# Altium PCB DC-UPS-v1.0.PcbDoc (part 2 of 8)
Units mil, origin at the board's own origin, x right, y up, seen from the top; angles counter-clockwise.
Board outline 5905.51 x 3937.01 mil, 4 copper layers (Top Layer, SIG+PWR, SIG+GND, Bottom Layer), stack 62.449 mil thick; 278 components, 138 nets, 716 pads, 780 vias.
Unrouted connection lines stored in the file: 13.
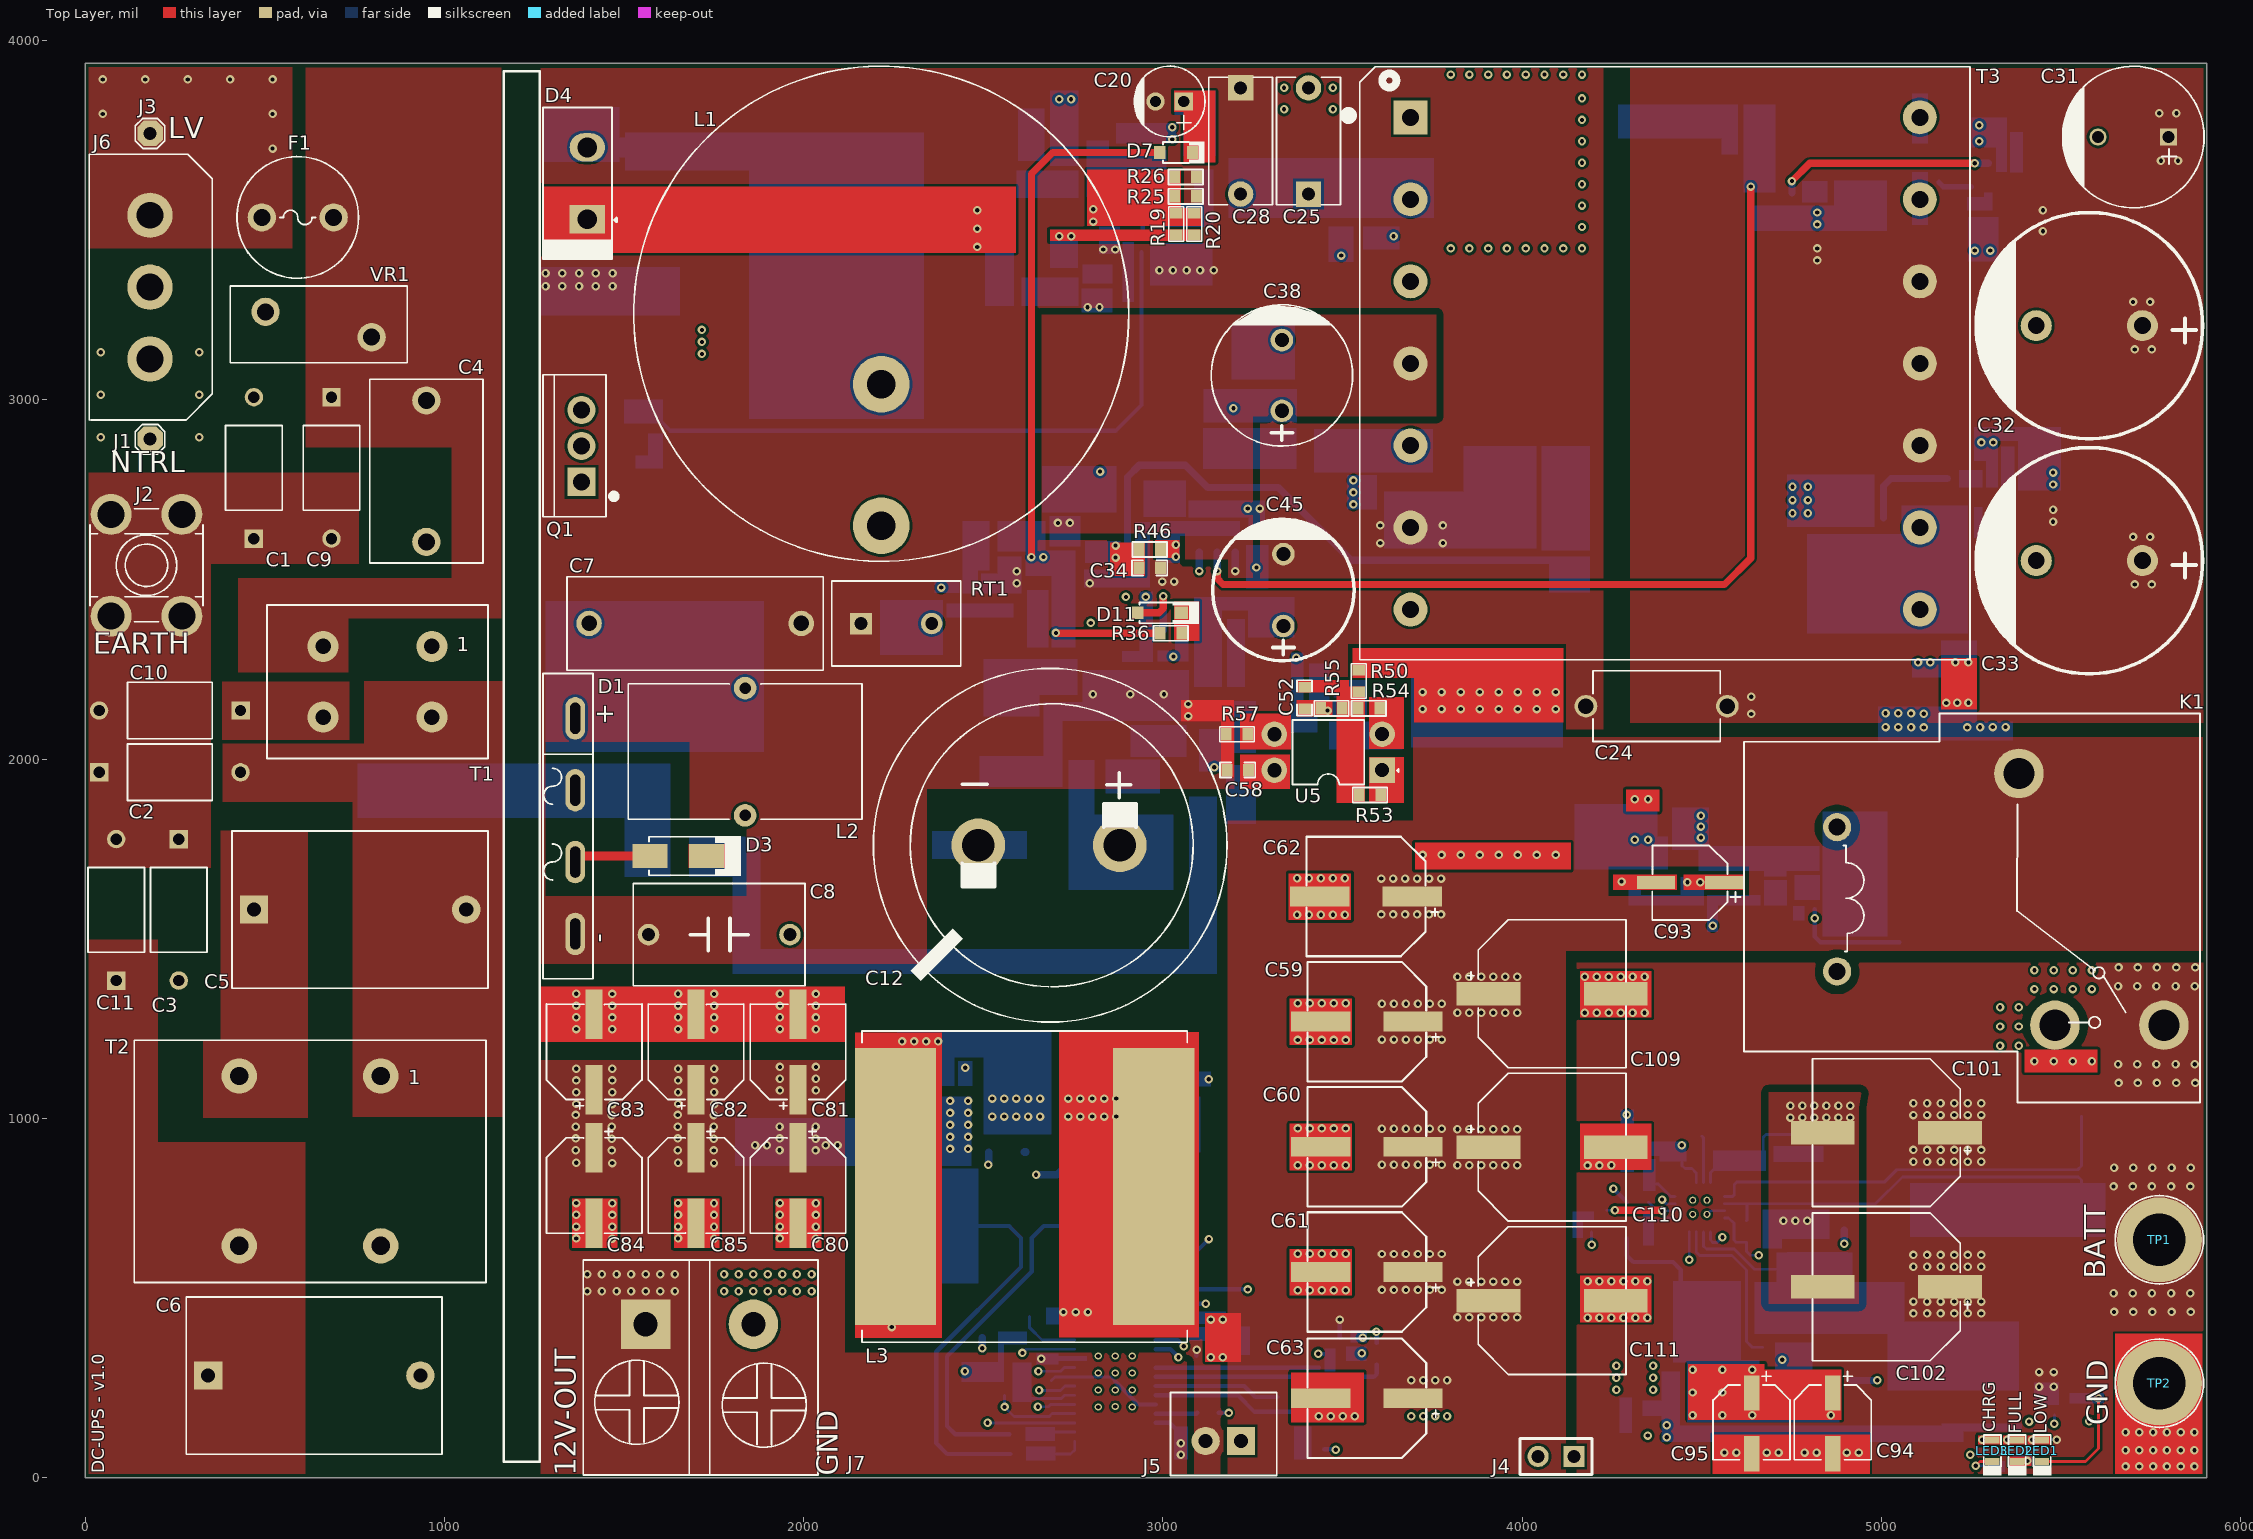
[diagram p0: Top Layer view]

## Part data (continued)
C18: library part CC0603KRX7R7BB224, "CAP CER 0.22UF 16V X7R 0603", Manufacturer=Yageo, Supplier Part Number=311-1426-1-ND, Voltage Rating (DC)=16V, ComponentLink1Description=https://datasheet.ciiva.com/11788/0900766b80d84f1d-11788400.pdf?src-supplier=Rs, ComponentLink1URL=https://datasheet.ciiva.com/11788/0900766b80d84f1d-11788400.pdf?src-supplier=Rs, ComponentLink2Description=https://datasheet.ciiva.com/176/mlccorderingcode-176606.pdf?src-supplier=Digikey, ComponentLink2URL=https://datasheet.ciiva.com/176/mlccorderingcode-176606.pdf?src-supplier=Digikey, ComponentLink3Description=https://datasheet.ciiva.com/176/mlccorderingcode-176607.pdf?src-supplier=Digikey, ComponentLink3URL=https://datasheet.ciiva.com/176/mlccorderingcode-176607.pdf?src-supplier=Digikey, ComponentLink4Description=https://datasheet.ciiva.com/176/mlccorderingcode-176608.pdf?src-supplier=Digikey, ComponentLink4URL=https://datasheet.ciiva.com/176/mlccorderingcode-176608.pdf?src-supplier=Digikey, Halogen Free=5694HalogenFree, Item Type=Capacitor, Lead Free=5697LeadFree, Manufacturer Part Number=CC0603KRX7R7BB224, Material=4241ConductorMaterial, Pricing="1=0.1, 10=0.058, 50=0.0334, 100=0.0258, 500=0.01944, 1000=0.01528 (USD)", RoHS=Yes, Stock=45192, Supplier=Digikey
C19 C74 C75 C76 C86 C89 C90 C98 C103 C105 C106: library part CL10B104KB8NNNL, "CAP CER 0.1UF 50V X7R 0603", Capacitance=100nF, Case/Package=0603, Dielectric=X7R, LCSC Part Number=C913912, Manufacturer=Samsung, Max Operating Temperature=125°C, Min Operating Temperature=-55°C, Package Quantity=15000, Supplier Part Number 1=1276-CL10B104KB8NNNLCT-ND, Tolerance=10%, Voltage Rating=50V, ComponentLink1Description=https://www.verical.com/server-webapp/html/getDatasheet?partID=357523&src-supplier=Verical, ComponentLink1URL=https://www.verical.com/server-webapp/html/getDatasheet?partID=357523&src-supplier=Verical, ComponentLink2Description=https://media.digikey.com/pdf/Data%20Sheets/Samsung%20PDFs/CL_Series_MLCC_ds.pdf?src-supplier=Digi-Key, ComponentLink2URL=https://media.digikey.com/pdf/Data%20Sheets/Samsung%20PDFs/CL_Series_MLCC_ds.pdf?src-supplier=Digi-Key, Construction=Flat, Depth=0.8mm, Height=0.8mm, Item Type=Capacitor, Length=1.6mm, Manufacturer Part Number=CL10B104KB8NNNL, Mount="Surface Mount", Packaging="Tape and Reel", Pricing 1="1=0.1, 10=0.03, 50=0.0164, 100=0.0134, 500=0.00958, 1000=0.00753, 2500=0.00684, 5000=0.0063 (USD)", Radiation Hardening=No, RoHS Compliant=Yes, Series=CL, Stock 1=3731229, Supplier 1=Digi-Key, Thickness=0.035inch, Voltage Rating (DC)=50V, Width=0.031inch
C20: library part ERM1HM100D11OT, "10uF 50V ±20% 90mA@100kHz Plugin,D5xL11mm Aluminum Electrolytic Capacitors - Leaded ROHS", LCSC Part Number=C106599, Manufacturer=AISHI, Item Type=Capacitor, Manufacturer Part Number=ERM1HM100D11OT, Pricing="1000=0.0178, 4000=0.017, 15000=0.0163, 40000=0.0158, 100000=0.015 (USD)", RoHS=No, Supplier="Future Electronics"
C21: library part CC1206KKX7R9BB474, "CAP CER 0.47UF 50V X7R 1206", LCSC Part Number=C277483, Manufacturer=Yageo, ComponentLink1Description=https://datasheet.ciiva.com/13210/upy-gp-np0-16v-to-50v-8-13210236.pdf?src-supplier=Mouser, ComponentLink1URL=https://datasheet.ciiva.com/13210/upy-gp-np0-16v-to-50v-8-13210236.pdf?src-supplier=Mouser, ComponentLink2Description=https://datasheet.ciiva.com/181/mlccorderingcode-181013.pdf?src-supplier=Digikey, ComponentLink2URL=https://datasheet.ciiva.com/181/mlccorderingcode-181013.pdf?src-supplier=Digikey, ComponentLink3Description=https://datasheet.ciiva.com/181/mlccorderingcode-181014.pdf?src-supplier=Digikey, ComponentLink3URL=https://datasheet.ciiva.com/181/mlccorderingcode-181014.pdf?src-supplier=Digikey, ComponentLink4Description=https://datasheet.ciiva.com/181/mlccorderingcode-181015.pdf?src-supplier=Digikey, ComponentLink4URL=https://datasheet.ciiva.com/181/mlccorderingcode-181015.pdf?src-supplier=Digikey, Item Type=Capacitor, Manufacturer Part Number=CC1206KKX7R9BB474, Material=4241ConductorMaterial, Pricing="3000=0.0393, 9000=0.0378, 15000=0.0371, 30000=0.0362, 60000=0.0349 (USD)", RoHS=Yes, Stock=36000, Supplier="Future Electronics"
C22: library part C0603C100K5RACAUTO, "CAP CER 10PF 50V X7R 0603", LCSC Part Number=C2170082, Manufacturer=KEMET, Temperature Coefficient=30ppm/°C, ComponentLink1Description=http://www.farnell.com/datasheets/2750555.pdf?src-supplier=Farnell, ComponentLink1URL=http://www.farnell.com/datasheets/2750555.pdf?src-supplier=Farnell, ComponentLink2Description=https://api.kemet.com/component-edge/download/datasheet/C0603C100K5RACAUTO.pdf?src-supplier=Digikey, ComponentLink2URL=https://api.kemet.com/component-edge/download/datasheet/C0603C100K5RACAUTO.pdf?src-supplier=Digikey, ComponentLink3Description=http://www.farnell.com/datasheets/2750555.pdf?src-supplier=Element14, ComponentLink3URL=http://www.farnell.com/datasheets/2750555.pdf?src-supplier=Element14, ComponentLink4Description=https://datasheet.octopart.com/C0603C100K5RACAUTO-KEMET-datasheet-86780146.pdf?src-supplier=Newark, ComponentLink4URL=https://datasheet.octopart.com/C0603C100K5RACAUTO-KEMET-datasheet-86780146.pdf?src-supplier=Newark, ComponentLink5Description=http://www.farnell.com/datasheets/2750555.pdf?src-supplier=Newark, ComponentLink5URL=http://www.farnell.com/datasheets/2750555.pdf?src-supplier=Newark, ComponentLink6Description=https://datasheet.octopart.com/C0603C100K5RACAUTO-KEMET-datasheet-140424581.pdf?src-supplier=TME, ComponentLink6URL=https://datasheet.octopart.com/C0603C100K5RACAUTO-KEMET-datasheet-140424581.pdf?src-supplier=TME, Height=870um, Item Type=Capacitor, Manufacturer Part Number=C0603C100K5RACAUTO, Material=4241ConductorMaterial, Pricing="1=0.25, 10=0.116, 50=0.116, 100=0.07, 1000=0.061, 10000=0.047 (USD)", RoHS=Yes, Stock=11331, Supplier=Mouser
C23: library part 06031C102KAT2A, "CAP CER 1000PF 100V X7R 0603", LCSC Part Number=C2167292, Manufacturer="Kyocera AVX", ComponentLink1Description=https://datasheet.ciiva.com/5422/cx7r-218113-5422905.pdf?src-supplier=Mouser, ComponentLink1URL=https://datasheet.ciiva.com/5422/cx7r-218113-5422905.pdf?src-supplier=Mouser, ComponentLink2Description=https://datasheet.ciiva.com/11499/cx7r-11499669.pdf?src-supplier=Avnet, ComponentLink2URL=https://datasheet.ciiva.com/11499/cx7r-11499669.pdf?src-supplier=Avnet, ComponentLink3Description=https://datasheet.ciiva.com/2987/cx7r-2987733.pdf?src-supplier=Avnet, ComponentLink3URL=https://datasheet.ciiva.com/2987/cx7r-2987733.pdf?src-supplier=Avnet, ComponentLink4Description=https://datasheet.ciiva.com/150/cx7r-150395.pdf?src-supplier=Digikey, ComponentLink4URL=https://datasheet.ciiva.com/150/cx7r-150395.pdf?src-supplier=Digikey, ComponentLink5Description=https://datasheet.ciiva.com/150/cx7r-150396.pdf?src-supplier=Digikey, ComponentLink5URL=https://datasheet.ciiva.com/150/cx7r-150396.pdf?src-supplier=Digikey, ComponentLink6Description=https://datasheet.ciiva.com/150/cx7r-150397.pdf?src-supplier=Digikey, ComponentLink6URL=https://datasheet.ciiva.com/150/cx7r-150397.pdf?src-supplier=Digikey, ComponentLink7Description=https://datasheet.ciiva.com/1124/1679506-1124198.pdf?src-supplier=Element14, ComponentLink7URL=https://datasheet.ciiva.com/1124/1679506-1124198.pdf?src-supplier=Element14, ComponentLink8Description=https://datasheet.ciiva.com/22693/1679506-22693579.pdf?src-supplier=Element14, ComponentLink8URL=https://datasheet.ciiva.com/22693/1679506-22693579.pdf?src-supplier=Element14, ComponentLink9Description=https://datasheet.ciiva.com/7855/1679506-7855033.pdf?src-supplier=Element14, ComponentLink9URL=https://datasheet.ciiva.com/7855/1679506-7855033.pdf?src-supplier=Element14, ComponentLink10Description=https://datasheet.ciiva.com/7855/84526-7855189.pdf?src-supplier=Element14, ComponentLink10URL=https://datasheet.ciiva.com/7855/84526-7855189.pdf?src-supplier=Element14, ComponentLink11Description=https://datasheet.ciiva.com/16289/cx7r-16289400.pdf?src-supplier=Future+Electronics, ComponentLink11URL=https://datasheet.ciiva.com/16289/cx7r-16289400.pdf?src-supplier=Future+Electronics, ComponentLink12Description=https://datasheet.ciiva.com/14594/70001075-14594623.pdf?src-supplier=Allied+Electronics, ComponentLink12URL=https://datasheet.ciiva.com/14594/70001075-14594623.pdf?src-supplier=Allied+Electronics, ComponentLink13Description=https://datasheet.ciiva.com/14600/70001075-14600988.pdf?src-supplier=Allied+Electronics, ComponentLink13URL=https://datasheet.ciiva.com/14600/70001075-14600988.pdf?src-supplier=Allied+Electronics, Item Type=Capacitor, Lead Free=5697LeadFree, Manufacturer Part Number=06031C102KAT2A, Pricing="4000=0.0086, 8000=0.0084, 16000=0.0082, 24000=0.008, 32000=0.0079 (USD)", RoHS=Yes, Stock=656000, Supplier=Avnet
C24: library part DE1E3RA222MA4BN01F, "2200 pF ±20% 250VAC Ceramic Capacitor E Radial, Disc", LCSC Part Number=C343981, Manufacturer=Murata, ComponentLink1Description=http://www.farnell.com/datasheets/2608335.pdf?src-supplier=Farnell, ComponentLink1URL=http://www.farnell.com/datasheets/2608335.pdf?src-supplier=Farnell, ComponentLink2Description=http://www.farnell.com/datasheets/2608335.pdf?src-supplier=Newark, ComponentLink2URL=http://www.farnell.com/datasheets/2608335.pdf?src-supplier=Newark, ComponentLink3Description=https://datasheet.octopart.com/DE1E3RA222MA4BN01F-Murata-datasheet-166166226.pdf?src-supplier=TME, ComponentLink3URL=https://datasheet.octopart.com/DE1E3RA222MA4BN01F-Murata-datasheet-166166226.pdf?src-supplier=TME, Item Type=Capacitors, Manufacturer Part Number=DE1E3RA222MA4BN01F, Pricing="1=0.42, 10=0.271, 50=0.271, 100=0.146, 1000=0.114, 10000=0.097 (USD)", RoHS=Yes, Stock=37677, Supplier=Mouser
C25 C28: library part KP223J2J0701, "22nF -40℃~+100℃ ±5% 630V Plugin,P=7.5mm Polypropylene Film Capacitors (CBB) ROHS", LCSC Part Number=C390073, Manufacturer=KYET, Package=Plugin,P=7.5mm, ComponentLink1Description=LCSC, ComponentLink1URL=https://www.lcsc.com/product-detail/Polypropylene-Film-Capacitors-CBB_KYET-KP223J2J0701_C390073.html, Item Type=Capacitor, Manufacturer Part Number=KP223J2J0701
C26 C27 C35 C36 C92: library part UMK316AB7475KL-T, "CAP CER 4.7UF 50V X7R 1206", Case Code (Imperial)=1206, Case Code (Metric)=3216, Dielectric=X7R, LCSC Part Number=C92853, Manufacturer="Taiyo Yuden", Max Operating Temperature=125°C, Min Operating Temperature=-55°C, Package Quantity=2000, Tolerance=10%, Voltage Rating=50V, Case/Package=1206, ComponentLink1Description=https://datasheet.ciiva.com/170/umk316ab7475kl-t-ss-170928.pdf?src-supplier=Digikey, ComponentLink1URL=https://datasheet.ciiva.com/170/umk316ab7475kl-t-ss-170928.pdf?src-supplier=Digikey, ComponentLink2Description=https://datasheet.ciiva.com/2990/umk316ab7475kl-t-ss-2990070.pdf?src-supplier=Avnet, ComponentLink2URL=https://datasheet.ciiva.com/2990/umk316ab7475kl-t-ss-2990070.pdf?src-supplier=Avnet, ComponentLink3Description=https://datasheet.ciiva.com/15922/1010umk316ab7475kl-t-15922628.pdf?src-supplier=Onlinecomponents.com, ComponentLink3URL=https://datasheet.ciiva.com/15922/1010umk316ab7475kl-t-15922628.pdf?src-supplier=Onlinecomponents.com, ComponentLink4Description=https://datasheet.ciiva.com/7975/1481447-7975911.pdf?src-supplier=Element14, ComponentLink4URL=https://datasheet.ciiva.com/7975/1481447-7975911.pdf?src-supplier=Element14, ComponentLink5Description=https://datasheet.ciiva.com/5413/mlcc-all-e-541559-5413006.pdf?src-supplier=Mouser, ComponentLink5URL=https://datasheet.ciiva.com/5413/mlcc-all-e-541559-5413006.pdf?src-supplier=Mouser, Construction=Flat, Depth=1.6mm, Height=1.6mm, Item Type=Capacitor, Length=3.2mm, Manufacturer Part Number=UMK316AB7475KL-T, Mounting Technology="Surface Mount", Packaging="Tape and Reel", Pins=2, Pricing="1=0.3, 10=0.198, 50=0.146, 100=0.1189, 500=0.09386, 1000=0.07925 (USD)", Radiation Hardening=No, Reach SVHC Compliant=Unknown, RoHS=Yes, RoHS Compliant=Yes, Series=M, Stock=392550, Supplier=Digikey, Termination=SMD/SMT, Voltage Rating (DC)=50V, Width=1.6mm
C29: library part GRM31A5C2J151JW01D, "CAP CER 150PF 630V C0G/NP0 1206", LCSC Part Number=C162445, Manufacturer=Murata, ComponentLink1Description=https://datasheet.ciiva.com/138/partnumbering-e-01-138796.pdf?src-supplier=Digikey, ComponentLink1URL=https://datasheet.ciiva.com/138/partnumbering-e-01-138796.pdf?src-supplier=Digikey, ComponentLink2Description=https://datasheet.ciiva.com/138/partnumbering-e-01-138797.pdf?src-supplier=Digikey, ComponentLink2URL=https://datasheet.ciiva.com/138/partnumbering-e-01-138797.pdf?src-supplier=Digikey, ComponentLink3Description=https://datasheet.ciiva.com/138/partnumbering-e-01-138798.pdf?src-supplier=Digikey, ComponentLink3URL=https://datasheet.ciiva.com/138/partnumbering-e-01-138798.pdf?src-supplier=Digikey, ComponentLink4Description=https://datasheet.ciiva.com/13240/c02e-2905-13240518.pdf?src-supplier=Mouser, ComponentLink4URL=https://datasheet.ciiva.com/13240/c02e-2905-13240518.pdf?src-supplier=Mouser, Item Type=Capacitor, Manufacturer Part Number=GRM31A5C2J151JW01D, Pricing="1=0.35, 10=0.194, 50=0.194, 100=0.12, 1000=0.1, 10000=0.08 (USD)", RoHS=Yes, Stock=4361, Supplier=Mouser
C30: library part GRM31A5C3A101JW01D, "CAP CER 100PF 1KV 5% NP0 1206", LCSC Part Number=C162451, Manufacturer=Murata, ComponentLink1Description=https://datasheet.ciiva.com/29535/partnumbering-e-01-29535608.pdf?src-supplier=Digikey, ComponentLink1URL=https://datasheet.ciiva.com/29535/partnumbering-e-01-29535608.pdf?src-supplier=Digikey, ComponentLink2Description=https://datasheet.ciiva.com/7829/1666664-7829029.pdf?src-supplier=Element14, ComponentLink2URL=https://datasheet.ciiva.com/7829/1666664-7829029.pdf?src-supplier=Element14, Item Type=Capacitor, Manufacturer Part Number=GRM31A5C3A101JW01D, Pricing="4000=0.0742, 8000=0.0723, 12000=0.0712, 16000=0.0704, 20000=0.068 (USD)", RoHS=Yes, Stock=4000, Supplier="Future Electronics"
C31: library part EEU-FR1V681B, "CAP ALUM 680UF 20% 35V RADIAL TH", Case/Package=Radial, ESR (Equivalent Series Resistance)=20mR, LCSC Part Number=C178718, Manufacturer=Panasonic, Max Operating Temperature=105°C, Min Operating Temperature=-40°C, Package Quantity=500, Ripple Current=2.18A, Tolerance=20%, Voltage Rating=35V, ComponentLink1Description=https://datasheet.ciiva.com/11677/aba0000ce132-11677705.pdf?src-supplier=Avnet, ComponentLink1URL=https://datasheet.ciiva.com/11677/aba0000ce132-11677705.pdf?src-supplier=Avnet, ComponentLink2Description=https://datasheet.ciiva.com/15941/aba0000ce132-15941222.pdf?src-supplier=Onlinecomponents.com, ComponentLink2URL=https://datasheet.ciiva.com/15941/aba0000ce132-15941222.pdf?src-supplier=Onlinecomponents.com, ComponentLink3Description=https://datasheet.ciiva.com/43469/1653413-43469593.pdf?src-supplier=Farnell, ComponentLink3URL=https://datasheet.ciiva.com/43469/1653413-43469593.pdf?src-supplier=Farnell, ComponentLink4Description=https://datasheet.ciiva.com/46371/1653413-46371786.pdf?src-supplier=Element14, ComponentLink4URL=https://datasheet.ciiva.com/46371/1653413-46371786.pdf?src-supplier=Element14, ComponentLink5Description=https://datasheet.ciiva.com/29248/448590-da-01-en-alu-kondensator-fr-r-680-uf-35v-500st-29248054.pdf?src-supplier=Conrad, ComponentLink5URL=https://datasheet.ciiva.com/29248/448590-da-01-en-alu-kondensator-fr-r-680-uf-35v-500st-29248054.pdf?src-supplier=Conrad, Diameter=10mm, Features="General Purpose", Height=20mm, Height - Seated (Max)=0.866inch, Impedance=20mR, Item Type=Capacitor, Lead Diameter=0.6mm, Lead Pitch=5mm, Lead/Base Style=Straight, Length=20mm, Life (Hours)=10000Hour, Manufacturer Part Number=EEU-FR1V681B, Mounting Technology="Through Hole", Packaging="Tape and Reel", Pricing="1=0.93, 10=0.674, 50=0.5894, 100=0.4803 (USD)", Radiation Hardening=No, Reach SVHC Compliant=Yes, RoHS=Yes, RoHS Compliant=Yes, Series=FR, Stock=566, Supplier=Digikey, Termination=Radial, Voltage Rating (DC)=35V
C32 C33: library part ERF1VM222L25OT, "2200uF 35V ±20% Plugin,D16xL25mm Aluminum Electrolytic Capacitors - Leaded ROHS", LCSC Part Number=C106547, Manufacturer=AISHI, Item Type=Capacitor, Manufacturer Part Number=ERF1VM222L25OT, Pricing="1=0.945, 10=0.446, 25=0.403, 50=0.338, 100=0.327, 250=0.316 (GBP)", RoHS=No, Stock=115, Supplier=Farnell
C34 C57: library part CGA3E2X8R1H473M080AA, "CAP CER 0.047UF 50V X8R 0603", Case Code (Imperial)=0603, Case Code (Metric)=1608, Dielectric=X8R, LCSC Part Number=C2172709, Manufacturer=TDK, Max Operating Temperature=150°C, Min Operating Temperature=-55°C, Package Quantity=4000, Ratings=AEC-Q200, Supplier Part Number 1=445-12603-1-ND, Tolerance=20%, Voltage Rating=50V, Capacitance=47nF, Case/Package=0603, Category="Ceramic Capacitors", ComponentLink1Description=http://www.mouser.com/ds/2/400/mlcc_automotive_hightemp_en-520039.pdf?src-supplier=Mouser, ComponentLink1URL=http://www.mouser.com/ds/2/400/mlcc_automotive_hightemp_en-520039.pdf?src-supplier=Mouser, ComponentLink2Description=https://product.tdk.com/info/en/catalog/spec/mlccspec_automotive_hightemp_en.pdf?src-supplier=Digi-Key, ComponentLink2URL=https://product.tdk.com/info/en/catalog/spec/mlccspec_automotive_hightemp_en.pdf?src-supplier=Digi-Key, ComponentLink3Description=http://product.tdk.com/en/catalog/datasheets/mlcc_automotive_hightemp_en.pdf?src-supplier=Avnet, ComponentLink3URL=http://product.tdk.com/en/catalog/datasheets/mlcc_automotive_hightemp_en.pdf?src-supplier=Avnet, Features="High Temperature", Height=0.8mm, Item Type=Capacitor, Length=0.063inch, Manufacturer Part Number=CGA3E2X8R1H473M080AA, Mount="Surface Mount", Packaging="Tape and Reel", Pricing 1="1=0.16000, 10=0.11200, 50=0.06360, 100=0.05260, 500=0.03690, 1000=0.03055 (USD)", RoHS=Yes, Stock 1=1279, Supplier 1=Digi-Key, Thickness=0.035inch, Voltage Rating (DC)=50V, Weight=7.1E-05oz, Width=0.031inch
C37 C41 C43: library part CC1206KRX7R9BB104, "CAP CER 0.1UF 50V X7R 1206", Case Code (Imperial)=1206, Case Code (Metric)=3216, Dielectric=X7R, Insulation Resistance=100GR, LCSC Part Number=311-1179-1-ND, Manufacturer=Yageo, Max Operating Temperature=125°C, Min Operating Temperature=-55°C, Tolerance=10%, Voltage=50V, Case/Package=1206, ComponentLink1Description=https://datasheet.ciiva.com/11786/0900766b80d84f1d-11786968.pdf?src-supplier=Rs, ComponentLink1URL=https://datasheet.ciiva.com/11786/0900766b80d84f1d-11786968.pdf?src-supplier=Rs, ComponentLink2Description=https://datasheet.ciiva.com/7978/1489800-7978230.pdf?src-supplier=Element14, ComponentLink2URL=https://datasheet.ciiva.com/7978/1489800-7978230.pdf?src-supplier=Element14, ComponentLink3Description=https://datasheet.ciiva.com/28450/1489800-28450892.pdf?src-supplier=Element14, ComponentLink3URL=https://datasheet.ciiva.com/28450/1489800-28450892.pdf?src-supplier=Element14, ComponentLink4Description=https://datasheet.ciiva.com/144/mlccorderingcode-144906.pdf?src-supplier=Digikey, ComponentLink4URL=https://datasheet.ciiva.com/144/mlccorderingcode-144906.pdf?src-supplier=Digikey, ComponentLink5Description=https://datasheet.ciiva.com/144/mlccorderingcode-144905.pdf?src-supplier=Digikey, ComponentLink5URL=https://datasheet.ciiva.com/144/mlccorderingcode-144905.pdf?src-supplier=Digikey, ComponentLink6Description=https://datasheet.ciiva.com/144/mlccorderingcode-144907.pdf?src-supplier=Digikey, ComponentLink6URL=https://datasheet.ciiva.com/144/mlccorderingcode-144907.pdf?src-supplier=Digikey, ComponentLink7Description=https://datasheet.ciiva.com/5425/upy-gp-np0-16v-to-50v-8-3714-5425561.pdf?src-supplier=Mouser, ComponentLink7URL=https://datasheet.ciiva.com/5425/upy-gp-np0-16v-to-50v-8-3714-5425561.pdf?src-supplier=Mouser, ComponentLink8Description=https://datasheet.ciiva.com/28363/1734573-28363672.pdf?src-supplier=Element14, ComponentLink8URL=https://datasheet.ciiva.com/28363/1734573-28363672.pdf?src-supplier=Element14, ComponentLink9Description=https://datasheet.ciiva.com/46385/1734573-46385063.pdf?src-supplier=Element14, ComponentLink9URL=https://datasheet.ciiva.com/46385/1734573-46385063.pdf?src-supplier=Element14, ComponentLink10Description=https://datasheet.ciiva.com/15189/getdatasheetpartid-251811-15189275.pdf?src-supplier=Verical, ComponentLink10URL=https://datasheet.ciiva.com/15189/getdatasheetpartid-251811-15189275.pdf?src-supplier=Verical, Depth=1.6mm, Halogen Free=5694HalogenFree, Height=0.85mm, Item Type=Capacitor, Lead Free=5697LeadFree, Length=3.2mm, Manufacturer Part Number=CC1206KRX7R9BB104, Material=Ceramic, Mounting Technology="Surface Mount", Packaging="Tape and Reel", Pins=2, Pricing="1=0.19, 10=0.128, 50=0.0764, 100=0.0601, 500=0.04436, 1000=0.03672 (USD)", Radiation Hardening=No, Reach SVHC Compliant=Unknown, RoHS=Yes, RoHS Compliant=Yes, Series=CC, Stock=520624, Supplier=Digikey, Termination=SMD/SMT, Voltage Rating=50V, Voltage Rating (DC)=50V
C38: library part EEU-FR1V471B, "CAP ALUM 470UF 20% 35V RADIAL", LCSC Part Number=C713403, Leakage Current=164.5uA, Manufacturer=Panasonic, ComponentLink1Description=https://datasheet.ciiva.com/43469/1653413-43469590.pdf?src-supplier=Farnell, ComponentLink1URL=https://datasheet.ciiva.com/43469/1653413-43469590.pdf?src-supplier=Farnell, ComponentLink2Description=https://datasheet.ciiva.com/11678/aba0000ce132-11678063.pdf?src-supplier=Avnet, ComponentLink2URL=https://datasheet.ciiva.com/11678/aba0000ce132-11678063.pdf?src-supplier=Avnet, ComponentLink3Description=https://datasheet.ciiva.com/46371/1653413-46371772.pdf?src-supplier=Element14, ComponentLink3URL=https://datasheet.ciiva.com/46371/1653413-46371772.pdf?src-supplier=Element14, ComponentLink4Description=https://datasheet.ciiva.com/7805/1725490-7805503.pdf?src-supplier=Element14, ComponentLink4URL=https://datasheet.ciiva.com/7805/1725490-7805503.pdf?src-supplier=Element14, ComponentLink5Description=https://datasheet.ciiva.com/30252/9aba0000ce132-30252342.pdf?src-supplier=Onlinecomponents.com, ComponentLink5URL=https://datasheet.ciiva.com/30252/9aba0000ce132-30252342.pdf?src-supplier=Onlinecomponents.com, ComponentLink6Description=https://datasheet.ciiva.com/16387/aba0000ce132-16387061.pdf?src-supplier=Future+Electronics, ComponentLink6URL=https://datasheet.ciiva.com/16387/aba0000ce132-16387061.pdf?src-supplier=Future+Electronics, ComponentLink7Description=https://datasheet.ciiva.com/14602/70257620-14602201.pdf?src-supplier=Allied+Electronics, ComponentLink7URL=https://datasheet.ciiva.com/14602/70257620-14602201.pdf?src-supplier=Allied+Electronics, ComponentLink8Description=https://datasheet.ciiva.com/29247/448536-da-01-en-alu-kondensator-fr-r-470-uf-35v-500st-29247995.pdf?src-supplier=Conrad, ComponentLink8URL=https://datasheet.ciiva.com/29247/448536-da-01-en-alu-kondensator-fr-r-470-uf-35v-500st-29247995.pdf?src-supplier=Conrad, Item Type=Capacitor, Lead Free=5697LeadFree, Manufacturer Part Number=EEU-FR1V471B, Pins=2NUMBER, Pricing="1=0.78, 10=0.461, 50=0.461, 100=0.375, 1000=0.263, 10000=0.23 (USD)", RoHS=Yes, Stock=21799, Supplier=Mouser
C39: library part CC1206KKX5R9BB225, "CAP CER 2.2UF 50V X5R 1206", Case Code (Imperial)=1206, Case Code (Metric)=3216, Dielectric=X5R, LCSC Part Number=C577210, Manufacturer=Yageo, Max Operating Temperature=85°C, Min Operating Temperature=-55°C, Package Quantity=2000, Tolerance=10%, Voltage Rating=50V, Case/Package=1206, ComponentLink1Description=http://www.mouser.com/ds/2/447/Yageo_UPY-GP_NP0_16V-to-50V_9-358835.pdf?src-supplier=Mouser, ComponentLink1URL=http://www.mouser.com/ds/2/447/Yageo_UPY-GP_NP0_16V-to-50V_9-358835.pdf?src-supplier=Mouser, ComponentLink2Description=http://www.yageo.com/documents/recent/UPY-GPHC_X5R_4V-to-50V_25.pdf?src-supplier=Digikey, ComponentLink2URL=http://www.yageo.com/documents/recent/UPY-GPHC_X5R_4V-to-50V_25.pdf?src-supplier=Digikey, Halogen Free="Halogen Free", Height=1.45mm, Item Type=Capacitor, Lead Free="Lead Free", Length=0.126inch, Manufacturer Part Number=CC1206KKX5R9BB225, Material=4241ConductorMaterial, Mounting Technology="Surface Mount", Packaging="Tape and Reel", Pricing="1=0.59, 10=0.395, 50=0.3144, 100=0.2597, 500=0.20286, 1000=0.17244 (USD)", RoHS=Yes, RoHS Compliant=Yes, Series=CC, Stock=4588, Supplier=Digikey, Termination=SMD/SMT, Thickness=0.071inch, Voltage Rating (DC)=50V, Weight=0.000571oz, Width=0.063inch
C40 C42 C46 C96: library part GRM188R6YA225KA12D, "CAP, 2.2µF, 35V, 10%, X5R, 0603", Case Code (Imperial)=0603, Case Code (Metric)=1608, Dielectric=X5R, LCSC Part Number=C86017, Manufacturer=Murata, Max Operating Temperature=85°C, Min Operating Temperature=-55°C, Package Quantity=4000, Supplier Part Number 1=490-7204-1-ND, Tolerance=10%, Voltage=35V, Capacitance=2.2uF, Case/Package=0603, Category="Ceramic Capacitors", ComponentLink1Description=https://datasheet.ciiva.com/14906/partnumbering-e-01-14906490.pdf?src-supplier=Digi-Key, ComponentLink1URL=https://datasheet.ciiva.com/14906/partnumbering-e-01-14906490.pdf?src-supplier=Digi-Key, ComponentLink2Description=https://datasheet.ciiva.com/14906/partnumbering-e-01-14906491.pdf?src-supplier=Digi-Key, ComponentLink2URL=https://datasheet.ciiva.com/14906/partnumbering-e-01-14906491.pdf?src-supplier=Digi-Key, ComponentLink3Description=https://datasheet.ciiva.com/14906/partnumbering-e-01-14906492.pdf?src-supplier=Digi-Key, ComponentLink3URL=https://datasheet.ciiva.com/14906/partnumbering-e-01-14906492.pdf?src-supplier=Digi-Key, Depth=0.8mm, Height=0.8mm, Item Type=Capacitor, Lead Free="Lead Free", Length=1.6mm, Manufacturer Part Number=GRM188R6YA225KA12D, Material=Ceramic, Mount="Surface Mount", Packaging="Tape and Reel", Pricing 1="1=0.21000, 10=0.14100, 50=0.08480, 100=0.07170, 500=0.04904, 1000=0.04338 (USD)", REACH SVHC="No SVHC", RoHS=Yes, RoHS Compliant=Yes, Series=GRM, Stock 1=81665, Supplier 1=Digi-Key, Termination=SMD/SMT, Thickness=0.035inch, Voltage Rating=35V, Voltage Rating (DC)=35V, Weight=0.000222oz, Width=0.8mm
C44: library part CC1206KKX7R7BB225, "CAP CER 2.2UF 16V X7R 1206", LCSC Part Number=C107183, Manufacturer=Yageo, ComponentLink1Description=https://datasheet.ciiva.com/11788/0900766b80d84f1d-11788402.pdf?src-supplier=Rs, ComponentLink1URL=https://datasheet.ciiva.com/11788/0900766b80d84f1d-11788402.pdf?src-supplier=Rs, ComponentLink2Description=https://datasheet.ciiva.com/11466/upy-gphc-x7r-6-3v-to-50v-8-11466572.pdf?src-supplier=Avnet, ComponentLink2URL=https://datasheet.ciiva.com/11466/upy-gphc-x7r-6-3v-to-50v-8-11466572.pdf?src-supplier=Avnet, ComponentLink3Description=https://datasheet.ciiva.com/5425/upy-gphc-x7r-6-3v-to-50v-8-12304-5425499.pdf?src-supplier=Mouser, ComponentLink3URL=https://datasheet.ciiva.com/5425/upy-gphc-x7r-6-3v-to-50v-8-12304-5425499.pdf?src-supplier=Mouser, Item Type=Capacitors, Manufacturer Part Number=CC1206KKX7R7BB225, Material=4241ConductorMaterial, Pricing="1=0.22, 10=0.144, 50=0.1012, 100=0.0817, 500=0.06072, 1000=0.05312 (USD)", RoHS=Yes, Stock=202610, Supplier=Digikey
C45: library part ERR1VM102G20OT, "1000uF 35V ±20% Plugin,D10xL20mm Aluminum Electrolytic Capacitors - Leaded ROHS", LCSC Part Number=C398835, Manufacturer=AISHI, Package=Plugin,D10xL20mm, ComponentLink1Description=LCSC, ComponentLink1URL=https://www.lcsc.com/product-detail/Aluminum-Electrolytic-Capacitors-Leaded_AISHI-Aihua-Group-ERR1VM102G20OT_C398835.html, Item Type=Capacitor, Manufacturer Part Number=ERR1VM102G20OT
C47: library part GRM31CR72A105KA01K, "CAP CER 1UF 100V X7R 1206", Case Code (Imperial)=1206, Case Code (Metric)=3216, Dielectric=X7R, LCSC Part Number=C909823, Manufacturer=Murata, Max Operating Temperature=125°C, Min Operating Temperature=-55°C, Package Quantity=1, Supplier Part Number 1=490-6523-1-ND, Tolerance=10%, Voltage Rating=100V, Capacitance=1uF, Case/Package=1206, Category="Ceramic Capacitors", ComponentLink1Description=https://datasheet.ciiva.com/11616/product-11616604.pdf?src-supplier=Avnet, ComponentLink1URL=https://datasheet.ciiva.com/11616/product-11616604.pdf?src-supplier=Avnet, ComponentLink2Description=https://datasheet.ciiva.com/6264/partnumbering-e-01-6264397.pdf?src-supplier=Digi-Key, ComponentLink2URL=https://datasheet.ciiva.com/6264/partnumbering-e-01-6264397.pdf?src-supplier=Digi-Key, ComponentLink3Description=https://datasheet.ciiva.com/6264/partnumbering-e-01-6264398.pdf?src-supplier=Digi-Key, ComponentLink3URL=https://datasheet.ciiva.com/6264/partnumbering-e-01-6264398.pdf?src-supplier=Digi-Key, ComponentLink4Description=https://datasheet.ciiva.com/6264/partnumbering-e-01-6264399.pdf?src-supplier=Digi-Key, ComponentLink4URL=https://datasheet.ciiva.com/6264/partnumbering-e-01-6264399.pdf?src-supplier=Digi-Key, Construction=Flat, Depth=1.6mm, Height=1.6mm, Length=3.2mm, Manufacturer Part Number=GRM31CR72A105KA01K, Mount="Surface Mount", Packaging="Tape and Reel", Pricing 1="1=0.48000, 10=0.33000, 50=0.23100, 100=0.19800, 500=0.14850, 1000=0.12540, 2500=0.11880 (USD)", Radiation Hardening=No, RoHS=Yes, RoHS Compliant=Yes, Series=GRM, Stock 1=11842, Supplier 1=Digi-Key, Termination=SMD/SMT, Thickness=0.071inch, Voltage Rating (DC)=100V, Width=1.6mm
C48 C49 C50: library part CC0603KRX5R7BB475, "CAP CER 4.7UF 16V X5R 0603", Case Code (Imperial)=0603, Case Code (Metric)=1608, Dielectric=X5R, LCSC Part Number=C277476, Manufacturer=Yageo, Max Operating Temperature=85°C, Min Operating Temperature=-55°C, Resistor Type=Ceramic, Supplier Part Number 1=311-1785-1-ND, Tolerance=10%, Voltage Rating=16V, Capacitance=4.7uF, Case/Package=0603, Category="Ceramic Capacitors", ComponentLink1Description=http://www.mouser.com/ds/2/447/UPY-GPHC_X5R_4V-to-50V_25-1131599.pdf?src-supplier=Mouser, ComponentLink1URL=http://www.mouser.com/ds/2/447/UPY-GPHC_X5R_4V-to-50V_25-1131599.pdf?src-supplier=Mouser, ComponentLink2Description=http://www.yageo.com/documents/recent/UPY-GPHC_X5R_4V-to-50V_25.pdf?src-supplier=Digi-Key, ComponentLink2URL=http://www.yageo.com/documents/recent/UPY-GPHC_X5R_4V-to-50V_25.pdf?src-supplier=Digi-Key, Depth=0.8mm, Halogen Free="Halogen Free", Height=0.8mm, Item Type=Capacitor, Lead Free="Lead Free", Length=1.6mm, Manufacturer Part Number=CC0603KRX5R7BB475, Mount="Surface Mount", Packaging="Tape and Reel", Pricing 1="1=0.20000, 10=0.13800, 50=0.08280, 100=0.06990, 500=0.04784, 1000=0.04233 (USD)", RoHS=Yes, RoHS Compliant=Yes, Series=CC, Stock 1=547703, Supplier 1=Digi-Key, Termination=SMD/SMT, Thickness=0.037inch, Voltage Rating (DC)=16V, Weight=7.1E-05oz, Width=0.8mm
C51 C54: library part CC0603KRX7R0BB103, "CAP CER 10000PF 100V X7R 0603", Case Code (Imperial)=0603, Case Code (Metric)=1608, Dielectric=X7R, Dielectric Material=Ceramic, LCSC Part Number=C107059, Manufacturer=Yageo, Max Operating Temperature=125°C, Min Operating Temperature=-55°C, Package Quantity=4000, Tolerance=10%, Voltage Rating=100V, Case/Package=0603, ComponentLink1Description=https://datasheet.ciiva.com/8033/1669968-8033774.pdf?src-supplier=Element14, ComponentLink1URL=https://datasheet.ciiva.com/8033/1669968-8033774.pdf?src-supplier=Element14, ComponentLink2Description=https://datasheet.ciiva.com/13389/upy-gphc-x7r-6-3v-to-50v-8-13389353.pdf?src-supplier=Mouser, ComponentLink2URL=https://datasheet.ciiva.com/13389/upy-gphc-x7r-6-3v-to-50v-8-13389353.pdf?src-supplier=Mouser, ComponentLink3Description=https://datasheet.ciiva.com/17458/upy-np0x7r-mv-100-to-630v-9-17458073.pdf?src-supplier=Future+Electronics, ComponentLink3URL=https://datasheet.ciiva.com/17458/upy-np0x7r-mv-100-to-630v-9-17458073.pdf?src-supplier=Future+Electronics, ComponentLink4Description=https://datasheet.ciiva.com/26829/getdatasheetpartid-626135-26829418.pdf?src-supplier=Verical, ComponentLink4URL=https://datasheet.ciiva.com/26829/getdatasheetpartid-626135-26829418.pdf?src-supplier=Verical, Construction=Flat, Depth=0.8mm, Height=0.8mm, Item Type=Capacitor, Lead Free="Lead Free", Length=1.6mm, Manufacturer Part Number=CC0603KRX7R0BB103, Mounting Technology="Surface Mount", Packaging="Tape and Reel", Pricing="4000=0.0051, 16000=0.0048, 60000=0.0045, 160000=0.0043, 400000=0.0041 (USD)", Radiation Hardening=No, Reach SVHC Compliant=Unknown, RoHS=Yes, RoHS Compliant=Yes, Series=CC, Stock=788000, Supplier="Future Electronics", Termination=SMD/SMT, Thickness=0.035inch, Voltage Rating (DC)=100V, Width=0.031inch
C52: library part CC0603JRNPO9BN101, "CAP CER 100PF 50V C0G/NPO 0603", Case Code (Imperial)=0603, Case Code (Metric)=1608, Dielectric=C0G, Insulation Resistance=100GR, LCSC Part Number=C14665, Manufacturer=Yageo, Max Operating Temperature=125°C, Min Operating Temperature=-55°C, Package Quantity=1, Resistor Type=Ceramic, Temperature Coefficient=30ppm/°C, Tolerance=5%, Voltage=50V, Capacitance=100pF, Case/Package=0603, Category="Ceramic Capacitors", ComponentLink1Description=https://datasheet.ciiva.com/11786/0900766b8079c870-11786060.pdf?src-supplier=RSComponents, ComponentLink1URL=https://datasheet.ciiva.com/11786/0900766b8079c870-11786060.pdf?src-supplier=RSComponents, ComponentLink2Description=https://datasheet.ciiva.com/7978/1443161-7978127.pdf?src-supplier=Element14, ComponentLink2URL=https://datasheet.ciiva.com/7978/1443161-7978127.pdf?src-supplier=Element14, ComponentLink3Description=https://datasheet.ciiva.com/28450/1443161-28450457.pdf?src-supplier=Element14, ComponentLink3URL=https://datasheet.ciiva.com/28450/1443161-28450457.pdf?src-supplier=Element14, ComponentLink4Description=https://datasheet.ciiva.com/46430/1835847-46430151.pdf?src-supplier=Element14, ComponentLink4URL=https://datasheet.ciiva.com/46430/1835847-46430151.pdf?src-supplier=Element14, ComponentLink5Description=https://datasheet.ciiva.com/144/mlccorderingcode-144629.pdf?src-supplier=Digi-Key, ComponentLink5URL=https://datasheet.ciiva.com/144/mlccorderingcode-144629.pdf?src-supplier=Digi-Key, ComponentLink6Description=https://datasheet.ciiva.com/144/mlccorderingcode-144628.pdf?src-supplier=Digi-Key, ComponentLink6URL=https://datasheet.ciiva.com/144/mlccorderingcode-144628.pdf?src-supplier=Digi-Key, ComponentLink7Description=https://datasheet.ciiva.com/144/mlccorderingcode-144630.pdf?src-supplier=Digi-Key, ComponentLink7URL=https://datasheet.ciiva.com/144/mlccorderingcode-144630.pdf?src-supplier=Digi-Key, ComponentLink8Description=https://datasheet.ciiva.com/11464/upy-gp-np0-16v-to-50v-8-11464725.pdf?src-supplier=Avnet, ComponentLink8URL=https://datasheet.ciiva.com/11464/upy-gp-np0-16v-to-50v-8-11464725.pdf?src-supplier=Avnet, ComponentLink9Description=https://datasheet.ciiva.com/26829/getdatasheetpartid-403525-26829372.pdf?src-supplier=Verical, ComponentLink9URL=https://datasheet.ciiva.com/26829/getdatasheetpartid-403525-26829372.pdf?src-supplier=Verical, Depth=0.8mm, Height=0.8mm, Lead Free="Lead Free", Length=1.6mm, Manufacturer Part Number=CC0603JRNPO9BN101, Mount="Surface Mount", Number of Pins=2, Packaging="Tape and Reel", Pricing 1="1=0.06030, 10=0.04400, 25=0.02170, 100=0.01580, 250=0.01330, 500=0.01300, 1000=0.01150, 3000=0.01010, 6000=0.00680 (USD)", Radiation Hardening=No, REACH SVHC=Unknown, RoHS=Yes, RoHS Compliant=Yes, Series=CC, Stock 1=10744, Supplier 1="Arrow Electronics", Supplier Part Number 1=CC0603JRNPO9BN101, Termination=SMD/SMT, Thickness=0.035inch, Voltage Rating=50V, Voltage Rating (DC)=50V, Width=0.8mm
C53: library part CS1608X7R221K500NRB, "50V 220pF X7R ±10% 0603 Multilayer Ceramic Capacitors MLCC - SMD/SMT ROHS", LCSC Part Number=C5255295, Manufacturer="Samwha Capacitors", Package=0603, ComponentLink1Description=LCSC, ComponentLink1URL=https://www.lcsc.com/product-detail/Multilayer-Ceramic-Capacitors-MLCC-SMD-SMT_Samwha-Capacitor-CS1608X7R221K500NRB_C5255295.html, Item Type=Capacitor, Manufacturer Part Number=CS1608X7R221K500NRB
C55 C58 C88: library part CC0603FRNPO9BN470, "CAP CER 47PF 50V NPO 0603", LCSC Part Number=C519486, Manufacturer=Yageo, ComponentLink1Description=https://datasheet.ciiva.com/5425/upy-gp-np0-16v-to-50v-8-5425545.pdf?src-supplier=Mouser, ComponentLink1URL=https://datasheet.ciiva.com/5425/upy-gp-np0-16v-to-50v-8-5425545.pdf?src-supplier=Mouser, ComponentLink2Description=https://datasheet.ciiva.com/11586/upy-gp-np0-16v-to-50v-8-11586472.pdf?src-supplier=Avnet, ComponentLink2URL=https://datasheet.ciiva.com/11586/upy-gp-np0-16v-to-50v-8-11586472.pdf?src-supplier=Avnet, Item Type=Capacitor, Manufacturer Part Number=CC0603FRNPO9BN470, Pricing="1=0.19, 10=0.126, 50=0.0756, 100=0.0594, 500=0.0439, 1000=0.03634 (USD)", RoHS=Yes, Stock=37282, Supplier=Digikey
C56: library part CC0603KRX7R0BB472, "CAP CER 4700PF 100V X7R 0603", Dielectric Material=4241ConductorMaterial, LCSC Part Number=C115052, Manufacturer=Yageo, Voltage Rating (AC)=100V, ComponentLink1Description=https://datasheet.ciiva.com/8033/1669968-8033781.pdf?src-supplier=Element14, ComponentLink1URL=https://datasheet.ciiva.com/8033/1669968-8033781.pdf?src-supplier=Element14, Item Type=Capacitor, Lead Free=5697LeadFree, Manufacturer Part Number=CC0603KRX7R0BB472, Pricing="1=0.1, 10=0.05, 50=0.0288, 100=0.0223, 500=0.0168, 1000=0.01319 (USD)", RoHS=Yes, Stock=67499, Supplier=Digikey
C59 C60 C61 C62 C63: library part 50SVPF18M, "CAP ALUM POLY 18UF 20% 50V SMD", LCSC Part Number=C178374, Manufacturer=Panasonic, ComponentLink1Description=https://datasheet.ciiva.com/24033/svpf-os-262415-24033818.pdf?src-supplier=Mouser, ComponentLink1URL=https://datasheet.ciiva.com/24033/svpf-os-262415-24033818.pdf?src-supplier=Mouser, ComponentLink2Description=https://datasheet.ciiva.com/25761/1734360-25761272.pdf?src-supplier=Farnell, ComponentLink2URL=https://datasheet.ciiva.com/25761/1734360-25761272.pdf?src-supplier=Farnell, ComponentLink3Description=https://datasheet.ciiva.com/48542/svpf-eng-ds-48542431.pdf?src-supplier=Distrelec, ComponentLink3URL=https://datasheet.ciiva.com/48542/svpf-eng-ds-48542431.pdf?src-supplier=Distrelec, ComponentLink4Description=https://datasheet.ciiva.com/22746/1734360-22746277.pdf?src-supplier=Element14, ComponentLink4URL=https://datasheet.ciiva.com/22746/1734360-22746277.pdf?src-supplier=Element14, Item Type=Capacitors, Manufacturer Part Number=50SVPF18M, Pricing="1=1.44, 10=0.995, 50=0.995, 100=0.799, 1000=0.562, 10000=0.498 (USD)", RoHS=Yes, Stock=2258, Supplier=Mouser
C64 C65 C66 C67 C68 C69 C70 C71 C72 C73: library part GRM21BR61H475KE51L, "CAP CER 4.7UF 50V X5R 0805", Capacitance=4.7uF, Case Code (Imperial)=0805, Case Code (Metric)=2012, Dielectric=X5R, LCSC Part Number=C162420, Manufacturer=Murata, Max Operating Temperature=85°C, Min Operating Temperature=-55°C, Supplier Part Number 1=1138707P, Tolerance=10%, Voltage Rating=50V, Case/Package=0805, Category="Ceramic Capacitors", ComponentLink1Description=http://www.farnell.com/datasheets/2079186.pdf?src-supplier=Farnell, ComponentLink1URL=http://www.farnell.com/datasheets/2079186.pdf?src-supplier=Farnell, ComponentLink2Description=http://components.arrow.com/part/dataview/61084395S454511N2606?src-supplier=Arrow+Electronics, ComponentLink2URL=http://components.arrow.com/part/dataview/61084395S454511N2606?src-supplier=Arrow+Electronics, ComponentLink3Description=http://www.farnell.com/datasheets/2079186.pdf?src-supplier=Element14, ComponentLink3URL=http://www.farnell.com/datasheets/2079186.pdf?src-supplier=Element14, ComponentLink4Description=http://search.murata.co.jp/Ceramy/image/img/A01X/G101/ENG/GRM21BR61H475KE51-01.pdf?src-supplier=Digi-Key, ComponentLink4URL=http://search.murata.co.jp/Ceramy/image/img/A01X/G101/ENG/GRM21BR61H475KE51-01.pdf?src-supplier=Digi-Key, ComponentLink5Description=https://search.murata.co.jp/Ceramy/image/img/A01X/G101/ENG/GRM21BR61H475KE51-01.pdf?src-supplier=Digi-Key, ComponentLink5URL=https://search.murata.co.jp/Ceramy/image/img/A01X/G101/ENG/GRM21BR61H475KE51-01.pdf?src-supplier=Digi-Key, ComponentLink6Description=http://www.farnell.com/datasheets/2079186.pdf?src-supplier=Newark, ComponentLink6URL=http://www.farnell.com/datasheets/2079186.pdf?src-supplier=Newark, Depth=1.25mm, Height=1.25mm, Item Type=Capacitor, Lead Free="Lead Free", Length=2mm, Manufacturer Part Number=GRM21BR61H475KE51L, Material=Ceramic, Mount="Surface Mount", Packaging="Tape and Reel", Pricing 1="500=0.09400, 1000=0.08800, 2000=0.08300, 5000=0.07500 (GBP)", Reach SVHC Compliant=Yes, RoHS=Yes, RoHS Compliant=Yes, Series=GRM, Stock 1=37300, Supplier 1=Rs, Thickness=0.055inch, Voltage Rating (DC)=50V, Width=0.049inch
C77: library part ECP-U1C684MA5, "CAP FILM 0.68UF 20% 16VDC 1206", LCSC Part Number=C569898, Manufacturer=Panasonic, Voltage Rating (AC)=16V, ComponentLink1Description=https://datasheet.ciiva.com/15225/getdatasheetpartid-259011-15225611.pdf?src-supplier=Verical, ComponentLink1URL=https://datasheet.ciiva.com/15225/getdatasheetpartid-259011-15225611.pdf?src-supplier=Verical, ComponentLink2Description=https://datasheet.ciiva.com/5710/31740-5710144.pdf?src-supplier=Farnell, ComponentLink2URL=https://datasheet.ciiva.com/5710/31740-5710144.pdf?src-supplier=Farnell, ComponentLink3Description=https://datasheet.ciiva.com/11792/0900766b80f2ea72-11792215.pdf?src-supplier=Rs, ComponentLink3URL=https://datasheet.ciiva.com/11792/0900766b80f2ea72-11792215.pdf?src-supplier=Rs, ComponentLink4Description=https://datasheet.ciiva.com/30243/abd0000ce12-30243739.pdf?src-supplier=Onlinecomponents.com, ComponentLink4URL=https://datasheet.ciiva.com/30243/abd0000ce12-30243739.pdf?src-supplier=Onlinecomponents.com, ComponentLink5Description=https://datasheet.ciiva.com/16397/abd0000ce12-16397064.pdf?src-supplier=Future+Electronics, ComponentLink5URL=https://datasheet.ciiva.com/16397/abd0000ce12-16397064.pdf?src-supplier=Future+Electronics, ComponentLink6Description=https://datasheet.ciiva.com/46399/31740-46399767.pdf?src-supplier=Element14, ComponentLink6URL=https://datasheet.ciiva.com/46399/31740-46399767.pdf?src-supplier=Element14, ComponentLink7Description=https://datasheet.ciiva.com/46400/31740-46400041.pdf?src-supplier=Element14, ComponentLink7URL=https://datasheet.ciiva.com/46400/31740-46400041.pdf?src-supplier=Element14, ComponentLink8Description=https://datasheet.ciiva.com/2993/abd0000ce12-2993739.pdf?src-supplier=Avnet, ComponentLink8URL=https://datasheet.ciiva.com/2993/abd0000ce12-2993739.pdf?src-supplier=Avnet, Item Type=Capacitors, Manufacturer Part Number=ECP-U1C684MA5, Pricing="2000=0.275, 4000=0.27, 6000=0.27, 8000=0.265 (USD)", RoHS=Yes, Stock=2000, Supplier="Future Electronics"
C78: library part CC0603KRX7R9BB683, "CAP CER 0.068UF 50V X7R 0603", Case Code (Imperial)=0603, Case Code (Metric)=1608, Dielectric=X7R, LCSC Part Number=C107098, Manufacturer=Yageo, Max Operating Temperature=125°C, Min Operating Temperature=-55°C, Supplier Part Number=3015344, Tolerance=10%, Voltage Rating=50V, Case/Package=0603, ComponentLink1Description=http://www.mouser.com/ds/2/447/Yageo_UPY-GP_NP0_16V-to-50V_9-358835.pdf?src-supplier=Mouser, ComponentLink1URL=http://www.mouser.com/ds/2/447/Yageo_UPY-GP_NP0_16V-to-50V_9-358835.pdf?src-supplier=Mouser, ComponentLink2Description=https://datasheet.octopart.com/CC0603KRX7R9BB683-Yageo-datasheet-166511530.pdf?src-supplier=Future+Electronics, ComponentLink2URL=https://datasheet.octopart.com/CC0603KRX7R9BB683-Yageo-datasheet-166511530.pdf?src-supplier=Future+Electronics, ComponentLink3Description=http://www.yageo.com/documents/recent/UPY-GPHC_X7R_6.3V-to-50V_18.pdf?src-supplier=Digikey, ComponentLink3URL=http://www.yageo.com/documents/recent/UPY-GPHC_X7R_6.3V-to-50V_18.pdf?src-supplier=Digikey, ComponentLink4Description=https://www.yageo.com/upload/media/product/productsearch/datasheet/mlcc/UPY-GPHC_X7R_6.3V-to-50V_18.pdf?src-supplier=Digikey, ComponentLink4URL=https://www.yageo.com/upload/media/product/productsearch/datasheet/mlcc/UPY-GPHC_X7R_6.3V-to-50V_18.pdf?src-supplier=Digikey, ComponentLink5Description=https://datasheet.octopart.com/CC0603KRX7R9BB683-Yageo-datasheet-140260305.pdf?src-supplier=Newark, ComponentLink5URL=https://datasheet.octopart.com/CC0603KRX7R9BB683-Yageo-datasheet-140260305.pdf?src-supplier=Newark, ComponentLink6Description=http://www.yageo.com/documents/recent/UPY-GPHC_X7R_6.3V-to-50V_9.pdf?src-supplier=Future+Electronics, ComponentLink6URL=http://www.yageo.com/documents/recent/UPY-GPHC_X7R_6.3V-to-50V_9.pdf?src-supplier=Future+Electronics, Halogen Free="Halogen Free", Item Type=Capacitors, Lead Free="Lead Free", Length=0.063inch, Manufacturer Part Number=CC0603KRX7R9BB683, Material=4241ConductorMaterial, Mounting Technology="Surface Mount", Packaging="Tape and Reel", Pricing="4000=0.0058, 16000=0.0055, 60000=0.0052, 160000=0.005, 400000=0.0047 (USD)", RoHS=Yes, RoHS Compliant=Yes, Series=CC, Stock=52000, Supplier="Future Electronics", Termination=SMD/SMT, Thickness=0.035inch, Voltage Rating (DC)=50V, Weight=7.1E-05oz, Width=0.031inch
C79: library part CC0603KRX7R9BB222, "CAP CER 2200PF 50V X7R 0603", Case Code (Imperial)=0603, Case Code (Metric)=1608, Dielectric=X7R, Insulation Resistance=10GR, LCSC Part Number=C107082, Manufacturer=Yageo, Max Operating Temperature=125°C, Min Operating Temperature=-55°C, Package Quantity=1, Resistor Type=Ceramic, Supplier Part Number 1=6169509, Tolerance=10%, Voltage=50V, Capacitance=2.2nF, Case/Package=0603, Category="Ceramic Capacitors", ComponentLink1Description=https://datasheet.ciiva.com/23768/1079489-23768004.pdf?src-supplier=Newark, ComponentLink1URL=https://datasheet.ciiva.com/23768/1079489-23768004.pdf?src-supplier=Newark, ComponentLink2Description=https://datasheet.ciiva.com/11788/0900766b8079c870-11788403.pdf?src-supplier=RSComponents, ComponentLink2URL=https://datasheet.ciiva.com/11788/0900766b8079c870-11788403.pdf?src-supplier=RSComponents, ComponentLink3Description=https://datasheet.ciiva.com/26862/getdatasheetpartid-403587-26862854.pdf?src-supplier=Verical, ComponentLink3URL=https://datasheet.ciiva.com/26862/getdatasheetpartid-403587-26862854.pdf?src-supplier=Verical, ComponentLink4Description=https://datasheet.ciiva.com/8033/70765-8033863.pdf?src-supplier=Element14, ComponentLink4URL=https://datasheet.ciiva.com/8033/70765-8033863.pdf?src-supplier=Element14, ComponentLink5Description=https://datasheet.ciiva.com/7978/1489800-7978172.pdf?src-supplier=Element14, ComponentLink5URL=https://datasheet.ciiva.com/7978/1489800-7978172.pdf?src-supplier=Element14, ComponentLink6Description=https://datasheet.ciiva.com/28450/1489800-28450632.pdf?src-supplier=Element14, ComponentLink6URL=https://datasheet.ciiva.com/28450/1489800-28450632.pdf?src-supplier=Element14, ComponentLink7Description=https://datasheet.ciiva.com/155/mlccorderingcode-155921.pdf?src-supplier=Digi-Key, ComponentLink7URL=https://datasheet.ciiva.com/155/mlccorderingcode-155921.pdf?src-supplier=Digi-Key, ComponentLink8Description=https://datasheet.ciiva.com/155/mlccorderingcode-155920.pdf?src-supplier=Digi-Key, ComponentLink8URL=https://datasheet.ciiva.com/155/mlccorderingcode-155920.pdf?src-supplier=Digi-Key, ComponentLink9Description=https://datasheet.ciiva.com/155/mlccorderingcode-155922.pdf?src-supplier=Digi-Key, ComponentLink9URL=https://datasheet.ciiva.com/155/mlccorderingcode-155922.pdf?src-supplier=Digi-Key, ComponentLink10Description=https://datasheet.ciiva.com/8033/1489800-8033864.pdf?src-supplier=Element14, ComponentLink10URL=https://datasheet.ciiva.com/8033/1489800-8033864.pdf?src-supplier=Element14, ComponentLink11Description=https://datasheet.ciiva.com/8033/1489800-8033862.pdf?src-supplier=Element14, ComponentLink11URL=https://datasheet.ciiva.com/8033/1489800-8033862.pdf?src-supplier=Element14, ComponentLink12Description=https://datasheet.ciiva.com/16625/upy-gphc-x7r-6-3v-to-50v-8-16625531.pdf?src-supplier=Avnet+Europe, ComponentLink12URL=https://datasheet.ciiva.com/16625/upy-gphc-x7r-6-3v-to-50v-8-16625531.pdf?src-supplier=Avnet+Europe, Depth=0.8mm, Dissipation Factor=2.5%, Halogen Free="Halogen Free", Height=0.8mm, Item Type=Capacitor, Lead Free="Lead Free", Length=1.6mm, Manufacturer Part Number=CC0603KRX7R9BB222, Mount="Surface Mount", Number of Pins=2, Packaging="Tape and Reel", Pricing 1="4000=0.00500 (USD)", Radiation Hardening=No, REACH SVHC="No SVHC", RoHS=Yes, RoHS Compliant=Yes, Series=CC, Stock 1=1, Supplier 1=RSComponents, Termination=SMD/SMT, Thickness=0.035inch, Voltage Rating=50V, Voltage Rating (DC)=50V, Width=0.031inch